# Altium PCB PCB1.PcbDoc
Units mm, origin at the board's own origin, x right, y up, seen from the top; angles counter-clockwise.
Board outline 151.89 x 130.3 mm, 2 copper layers (Top Layer, Bottom Layer); 18 components, 48 nets, 166 pads, 0 vias.
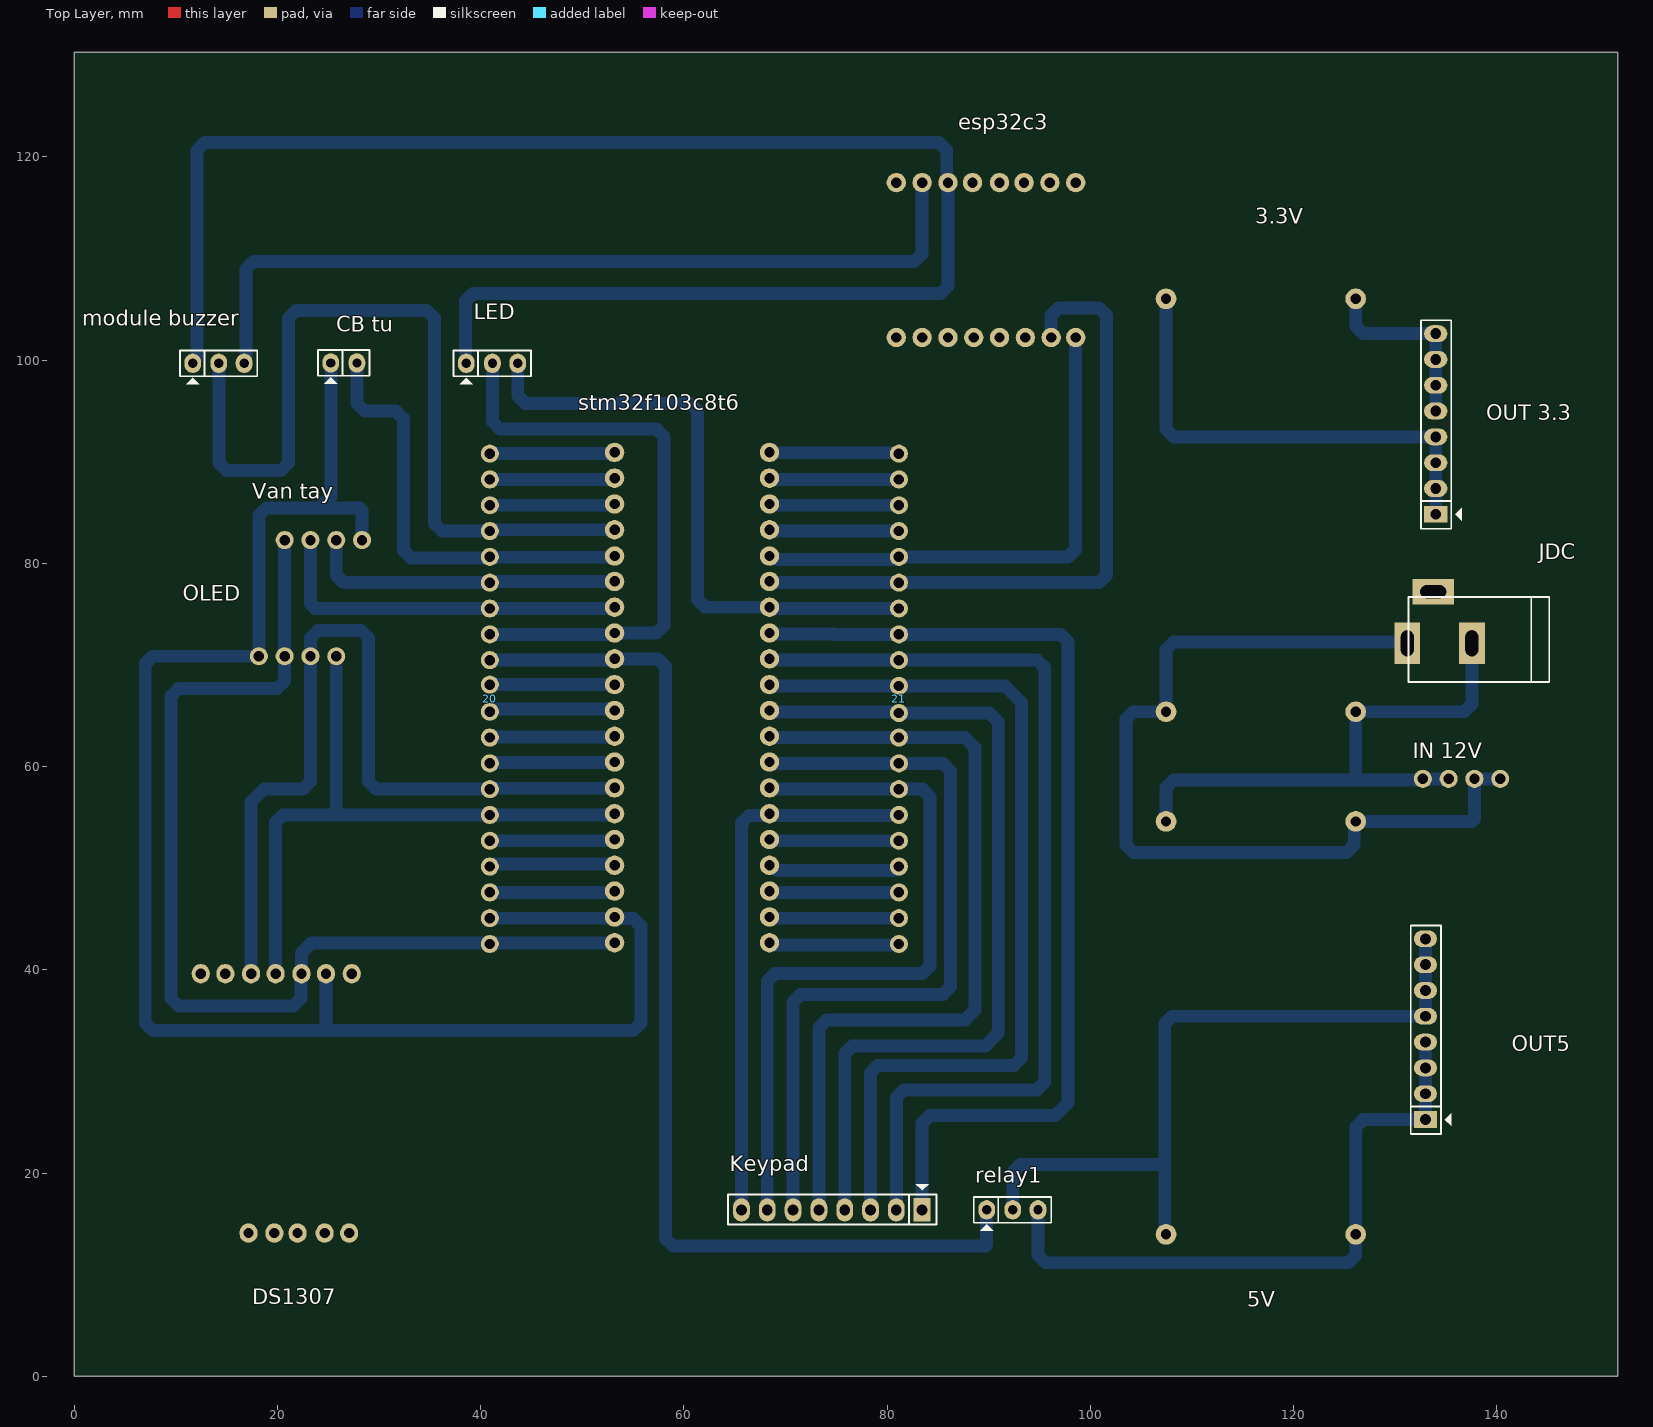
[diagram p0: Top Layer view]
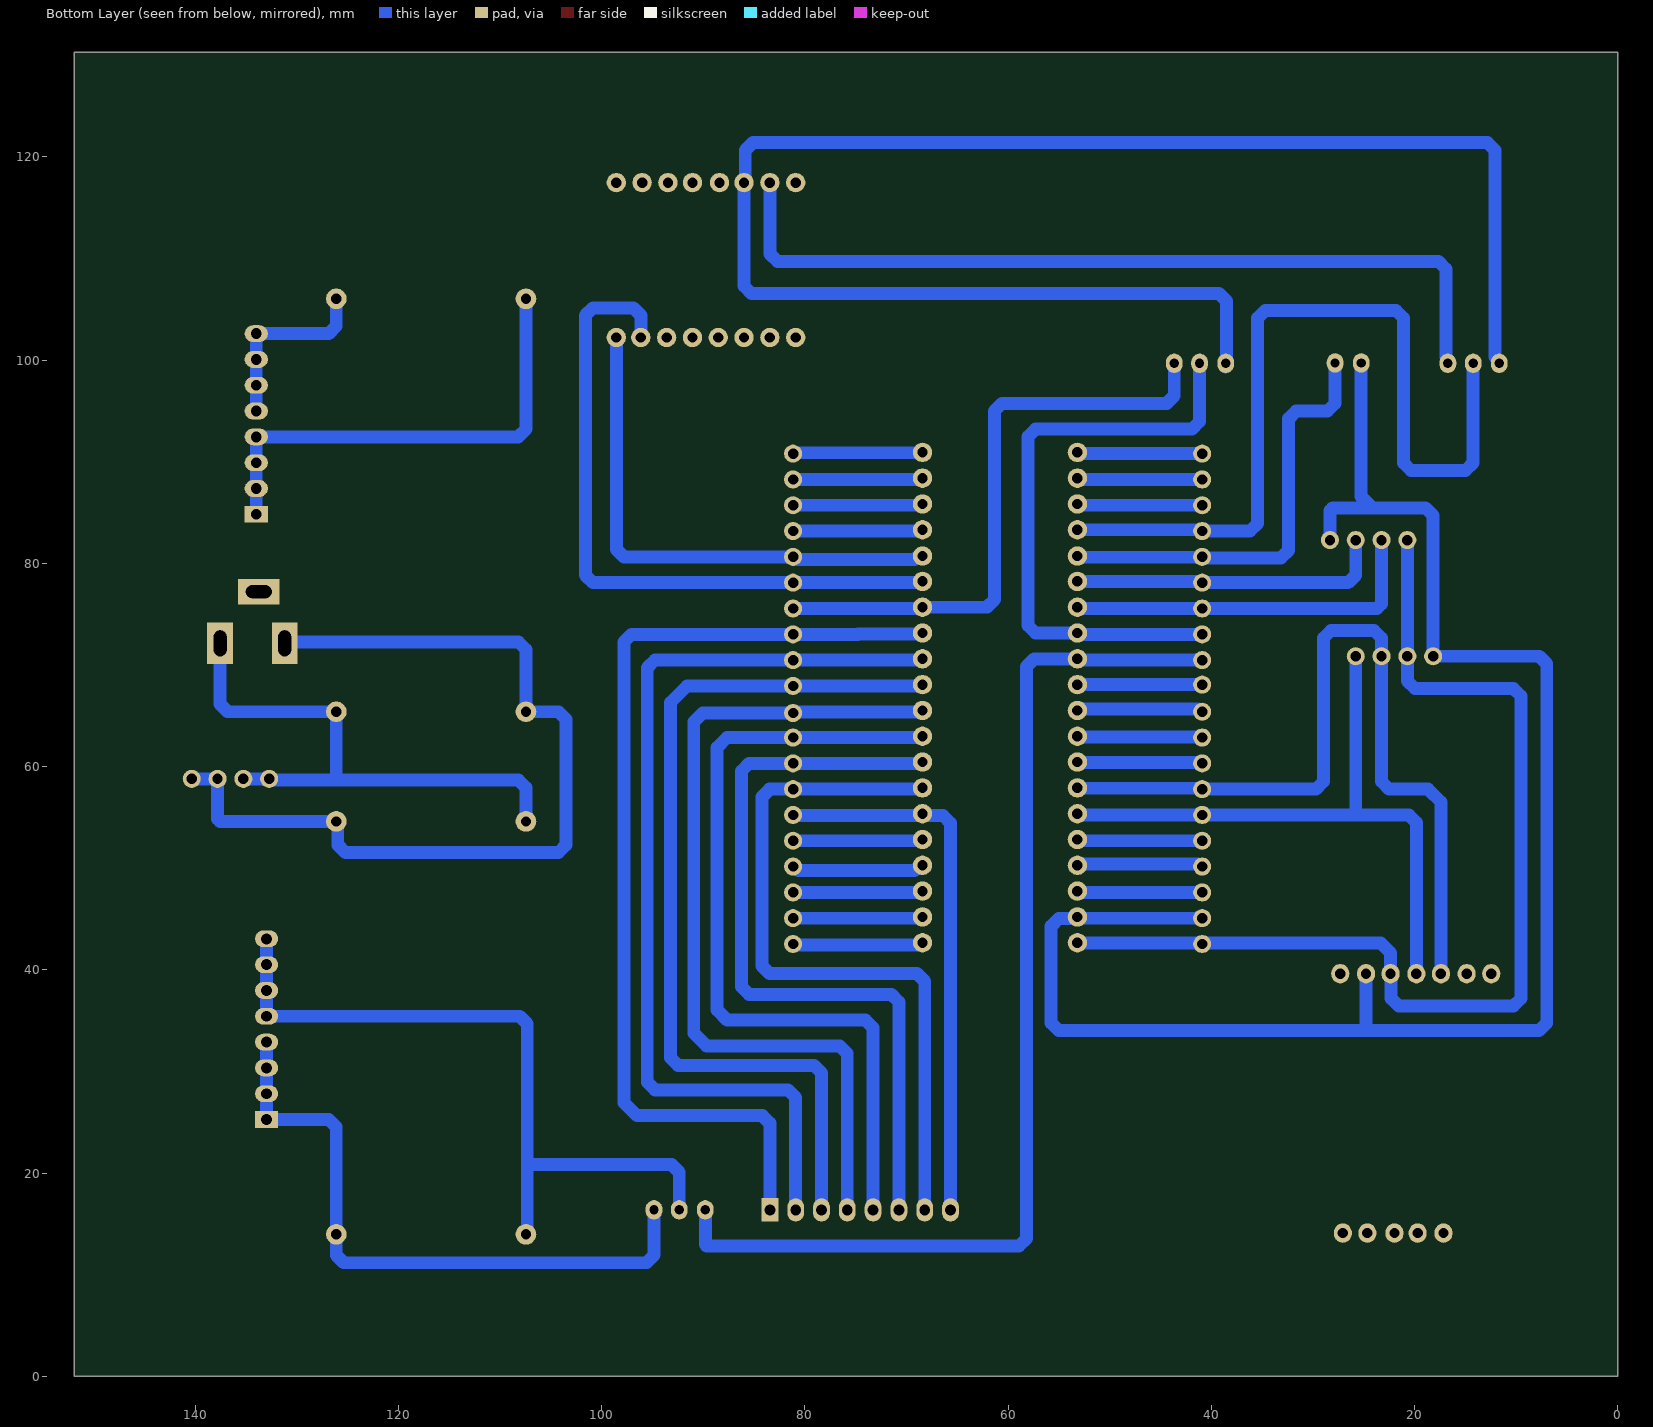
[diagram p1: Bottom Layer view, seen from below]

## Layer stack, top to bottom
Top Solder: solder mask 0.0102, Solder Resist, Dk 3.5
Top Layer: signal copper 0.0356
Dielectric 1: dielectric 0.32, FR-4, Dk 4.8
Bottom Layer: signal copper 0.0356
Bottom Solder: solder mask 0.0102, Solder Resist, Dk 3.5

## Board outline
0,0 151.892,0 151.892,130.302 0,130.302

## Design rules (kind name [scope] priority, off if disabled: settings)
Clearance [All] p1: gap=0.254 ignorepadtopadclearanceinfootprint=FALSE
PolygonConnect [All] p1: connectstyle=Relief reliefconductorwidth=0.254 reliefentries=4 polygonreliefangle="90 Angle" airgapwidth=0.254
RoutingLayers [All] p1: top layer_v5=FALSE bottom layer_v5=TRUE
RoutingVias [All] p1: holewidth=0.711 width=1.27 viastyle="Through Hole" minholewidth=0.711 minwidth=1.27 maxholewidth=0.711 maxwidth=1.27
SolderMaskExpansion [All] p1: expansion=0.102 istentingtop=FALSE
Width [All] p1: maxlimit=2.54 minlimit=0.762 preferedwidth=1.27
29 further rules are at their usual default settings.

## Components (designator, comment, footprint, x,y, rotation, side; value= is the part's Value field where it differs from the comment)
3.3V "lm2596" lm2596 107.696,54.102 r90 top
5V "lm2596" lm2596 125.857,65.913 r270 top
20 "jp20" jp20 67.056,45.466 r180 top
21 "jp20" jp20 54.991,87.884 r0 top
"CB tu" "Jumper 2" JP2 25.248,99.733 r0 top value="JP 2"
DS1307 "DS1307" DS1307 19.304,2.286 r90 top
esp32c3 "esp32c3" esp32c3 80.645,100.457 r90 top
"IN 12V" "jp4" jp4 142.113,73.406 r270 top
JDC "Jac DC" DC-IN 134.366,74.676 r180 top
Keypad "JP8 PIN" JP8 83.439,16.383 r180 top value=JP7
LED "Jumper 3" JP3 41.123,99.695 r0 top value=J3
"module buzzer" "Jumper 3" JP3 14.199,99.695 r0 top value=J3
OLED "oled 0.96" "oled 0.96" 2.54,70.866 r0 top
OUT5 "JP8 PIN" JP8 132.969,25.273 r90 top value=JP7
"OUT 3.3" "JP8 PIN" JP8 133.985,84.836 r90 top value=JP7
relay1 "Jumper 3" JP3 92.329,16.383 r0 top value=J3
stm32f103c8t6 "stm32f103c8t6" stm32f103c8t6 44.791,84.709 r0 top
"Van tay" "jp4" jp4 18.923,67.691 r90 top

## Footprints (in the part's own frame and the unit in brackets; to place one, negate y for a bottom-side part, rotate by r counter-clockwise, add the part's x,y. Pads: shape width x height; smd on the part's side, far side on the other; paste and mask are expansions set on the pad)
DC-IN [mil] "Jac DC input"
  rect 100x160 hole 50 slot 100 at 90 deg: 1(125,100) 2(-125,100)
  rect 160x100 hole 50 slot 100 at 0 deg: 3(25,-100)
  silkscreen extent -425,-80 120,250, body extent -410,-105 134,269, height 434
DS1307 [mil]
  oval 75x70 hole 40: 1(465,85) 2(465,-15) 3(465,-105) 4(465,-210) 5(465,-305) BAT(1470,-315) DS(1470,175) GND(1470,-215) SCL(1470,75) SDA(1470,-20) SQ(1470,270) VCC(1470,-120)
  body extent 415,-671 1520,451, height 374
esp32c3 [mil]
  round 75 hole 40: 1(70,-10) 2(70,-110) 3(70,-210) 4(70,-310) 5(70,-410) 6(70,-510) 7(70,-610) 8(70,-705) 9(670,-705) 10(670,-605) 11(670,-505) 12(670,-410) 13(670,-305) 14(670,-210) 15(670,-110) 16(670,-10)
  body extent 19,-834 720,114, height 374
JP2 [mil]
  oval 65x75 hole 36: 1(0,0) 2(101,0)
  silkscreen extent -50,-81 150,50, body extent -48,-50 148,48, height 323
JP3 [mil] "Jumper 3"
  oval 65x75 hole 36: 1(-100,0) 2(1,0) 3(99,0)
  silkscreen extent -150,-81 150,50, body extent -150,-60 150,55, height 355
jp4 [mil]
  round 70 hole 40: 1(575,-70) 2(575,-170) 3(575,-270) 4(575,-370)
  body extent 525,-420 625,-20, height 374
JP8 [mil] "JP8"
  rect 65x90 hole 42: 1(0,0)
  oval 65x90 hole 42: 2(100,0) 3(200,0) 4(300,0) 5(400,0) 6(500,0) 7(600,0) 8(700,0)
  silkscreen extent -56,-100 752,57, body extent -48,-50 748,48, height 323
jp20 [mil]
  round 70 hole 40: 1(1030,115) 2(1030,15) 3(1030,-85) 4(1030,-185) 5(1030,-285) 6(1030,-385) 7(1030,-485) 8(1030,-585) 9(1030,-685) 10(1030,-785) 11(1030,-890) 12(1030,-985) 13(1030,-1085) 14(1030,-1185) 15(1030,-1285) 16(1030,-1385) 17(1030,-1485) 18(1030,-1585) 19(1030,-1685) 20(1030,-1785)
  body extent 980,-1835 1080,165, height 350
lm2596 [mil]
  round 80 hole 40: IN+(445,10) IN-(445,-725) OUT+(2045,10) OUT-(2045,-725)
  body extent 395,-776 2093,56, height 716
"oled 0.96" [mil]
  round 70 hole 40: GND(615,0) SCL(815,0) SDA(915,0) VCC(715,0)
  body extent 224,-1025 1306,69, height 474
stm32f103c8t6 [mil]
  round 75 hole 40: 1(330,245) 2(330,145) 3(330,45) 4(330,-55) 5(330,-156.69) 6(330,-255) 7(330,-355) 8(330,-455) 9(330,-555) 10(330,-655) 11(330,-755) 12(330,-855) 13(330,-955) 14(330,-1055) 15(330,-1155) 16(330,-1255) 17(330,-1355) 18(330,-1455) 19(330,-1555) 20(330,-1655) 21(930,-1655) 22(930,-1555) 23(930,-1455) 24(930,-1355) 25(930,-1255) 26(930,-1155) 27(930,-1055) 28(930,-955) 29(930,-855) 30(930,-755) 31(930,-655) 32(930,-555) 33(930,-455) 34(930,-355) 35(930,-255) 36(930,-156.69) 37(930,-55) 38(930,45) 39(930,145) 40(930,245)
  body extent 180,-1888 1080,378, height 545

## Part data
"CB tu": library part "JP 2"
JDC: library part DCIN, "Jac DC input"
Keypad OUT5 "OUT 3.3": library part JP8
LED "module buzzer" relay1: library part JP3

## Nets (pads, with @x,y where several pads share a name; then routed paths per layer and width w, separated by ;. In a path a pad name is that pad's centre, name@x,y a point inside that pad or via, vN(x,y) a via of type N, cw(c..) or ccw(c..) an arc to the next point about the centre after c; other vN are vias at no path point)
Net3.3V_IN+: 3.3V.IN+ 5V.IN+ "IN 12V.1" "IN 12V.2" JDC.1 | length 90.5
  Bottom Layer w1.27: JDC.1 130.683,72.136 130.556,72.263 108.186,72.263 107.442,71.519 3.3V.IN+ 104.249,65.405 103.505,64.661 103.505,52.306 104.249,51.562 125.221,51.562 125.965,52.306 125.965,54.464 5V.IN+ 137.541,54.61 137.795,54.864 137.795,58.801 140.335,58.801
Net3.3V_IN-: 3.3V.IN- 5V.IN- "IN 12V.3" "IN 12V.4" JDC.2 | length 56
  Bottom Layer w1.27: 5V.IN- 107.442,57.93 108.186,58.674 125.984,58.674 ; 132.715,58.674 125.984,58.674 ; 132.715,58.801 135.255,58.801 ; JDC.2 137.541,66.149 136.797,65.405 3.3V.IN- 126.111,58.801 125.984,58.674
Net3.3V_OUT+: 3.3V.OUT+ "OUT 3.3.1" "OUT 3.3.2" "OUT 3.3.3" "OUT 3.3.4" | length 47.3
  Bottom Layer w1.27: 3.3V.OUT+ 107.442,93.218 108.204,92.456 133.985,92.456 133.985,89.916 133.985,87.376 133.985,84.836
Net3.3V_OUT-: 3.3V.OUT- "OUT 3.3.5" "OUT 3.3.6" "OUT 3.3.7" "OUT 3.3.8" | length 18.5
  Bottom Layer w1.27: 3.3V.OUT- 126.111,103.36 126.855,102.616 133.985,102.616 133.985,100.076 133.985,97.536 133.985,94.996
Net5V_OUT+: 5V.OUT+ OUT5.1 OUT5.2 OUT5.3 OUT5.4 relay1.3 | length 63.7
  Bottom Layer w1.27: relay1.3 94.844,11.92 95.588,11.176 125.367,11.176 126.111,11.92 126.111,24.529 126.855,25.273 OUT5.1 OUT5.2 OUT5.3 OUT5.4
Net5V_OUT-: 5V.OUT- OUT5.5 OUT5.6 OUT5.7 OUT5.8 relay1.2 | length 73.3
  Bottom Layer w1.27: relay1.2 92.354,20.084 93.098,20.828 107.315,20.828 ; 5V.OUT- 107.315,14.097 107.315,20.828 ; OUT5.8 OUT5.7 OUT5.6 OUT5.5 108.059,35.433 107.315,34.689 107.315,20.828
Net20_1: 20.1 "Van tay.1" DS1307.VCC OLED.VCC stm32f103c8t6.20 | length 104.6
  Bottom Layer w1.27: 20.701,82.296 OLED.VCC 20.701,68.435 19.957,67.691 10.269,67.691 9.525,66.947 9.525,37.193 10.269,36.449 21.548,36.449 22.292,37.193 DS1307.VCC@22.292,39.534 ; DS1307.VCC 22.352,41.674 23.32,42.642 20.1@41.129,42.642 ; 20.1@40.981,42.632 stm32f103c8t6.20@53.213,42.632
Net20_2: 20.2 "CB tu.1" "Van tay.4" DS1307.GND OLED.GND stm32f103c8t6.19 | length 168.5
  Bottom Layer w1.27: 24.765,34.163 DS1307.GND ; 25.248,99.733 25.248,86.589 24.13,85.471 ; 28.321,82.296 28.321,85.217 28.067,85.471 24.13,85.471 ; 20.2 52.874,45.085 53.001,45.212 stm32f103c8t6.19 ; stm32f103c8t6.19@53.213,45.045 55.009,45.045 55.753,44.301 55.753,34.78 55.009,34.036 7.729,34.036 6.985,34.78 6.985,70.122 7.729,70.866 OLED.GND 18.161,84.727 18.905,85.471 24.13,85.471
Net20_3: 20.3 stm32f103c8t6.18 | length 12.3
  Bottom Layer w1.27: 20.3 stm32f103c8t6.18@53.173,47.625
Net20_4: 20.4 stm32f103c8t6.17 | length 12.5
  Bottom Layer w1.27: 20.4 41.031,50.165 41.285,50.419 52.747,50.419 53.041,50.125 stm32f103c8t6.17@53.213,50.125
Net20_5: 20.5 stm32f103c8t6.16 | length 12.2
  Bottom Layer w1.27: 20.5 stm32f103c8t6.16@53.126,52.705
Net20_6: 20.6 DS1307.SDA OLED.SDA stm32f103c8t6.15 | length 64.2
  Bottom Layer w1.27: DS1307.SDA 19.812,54.501 20.556,55.245 25.781,55.245 ; OLED.SDA 25.781,55.245 ; stm32f103c8t6.15@53.173,55.245 20.6 25.781,55.245
Net20_7: 20.7 DS1307.SCL OLED.SCL stm32f103c8t6.14 | length 83
  Bottom Layer w1.27: DS1307.SCL 17.399,56.515 18.669,57.785 22.497,57.785 23.241,58.529 23.241,71.101 OLED.SCL@23.31,71.032 ; OLED.SCL 23.241,72.662 23.985,73.406 28.212,73.406 28.956,72.662 28.956,58.529 29.7,57.785 20.7 ; 20.7@40.981,57.872 stm32f103c8t6.14@53.213,57.872
Net20_8: 20.8 stm32f103c8t6.13 | length 12.2
  Bottom Layer w1.27: 20.8@40.981,60.412 stm32f103c8t6.13@53.213,60.412
Net20_9: 20.9 stm32f103c8t6.12 | length 12.5
  Bottom Layer w1.27: 20.9 40.957,62.928 53.109,62.928 stm32f103c8t6.12 ; stm32f103c8t6.12@53.091,62.819 stm32f103c8t6.12@53.213,62.698
Net20_10: 20.10 stm32f103c8t6.11 | length 12.5
  Bottom Layer w1.27: 20.10 41.031,65.405 41.285,65.659 52.747,65.659 53.041,65.365 stm32f103c8t6.11@53.213,65.365
Net20_11: 20.11 stm32f103c8t6.10 | length 12.3
  Bottom Layer w1.27: 20.11 stm32f103c8t6.10
Net20_12: 20.12 relay1.1 stm32f103c8t6.9 | length 109.3
  Bottom Layer w1.27: 20.12 stm32f103c8t6.9@53.173,70.485 ; stm32f103c8t6.9 57.422,70.612 58.166,69.868 58.166,13.571 58.91,12.827 89.662,12.827 89.789,12.954 relay1.1
Net20_13: 20.13 LED.2 stm32f103c8t6.8 | length 58.8
  Bottom Layer w1.27: 20.13 stm32f103c8t6.8@53.126,73.025 ; LED.2@41.148,99.314 41.148,93.962 41.892,93.218 57.295,93.218 58.039,92.474 58.039,73.896 57.295,73.152 stm32f103c8t6.8
Net20_14: 20.14 "Van tay.2" stm32f103c8t6.7 | length 36.4
  Bottom Layer w1.27: 23.241,82.296 23.241,76.026 23.702,75.565 20.14 stm32f103c8t6.7@53.173,75.565
Net20_15: 20.15 "Van tay.3" stm32f103c8t6.6 | length 31.2
  Bottom Layer w1.27: 25.781,82.296 25.781,78.849 26.525,78.105 20.15 40.991,78.202 41.35,78.202 41.38,78.232 stm32f103c8t6.6
Net20_16: 20.16 "CB tu.2" stm32f103c8t6.5 | length 43.3
  Bottom Layer w1.27: 27.813,99.733 27.813,95.74 28.557,94.996 31.641,94.996 32.385,94.252 32.385,81.292 33.129,80.548 40.797,80.548 20.16 ; 20.16@40.934,80.605 stm32f103c8t6.5@53.213,80.605
Net20_17: 20.17 "module buzzer.2" stm32f103c8t6.4 | length 84.8
  Bottom Layer w1.27: 14.224,99.695 14.224,89.898 14.968,89.154 20.338,89.154 21.082,89.898 21.082,104.158 21.826,104.902 34.689,104.902 35.433,104.158 35.433,83.929 36.177,83.185 20.17 40.991,83.282 41.35,83.282 41.38,83.312 stm32f103c8t6.4
Net20_18: 20.18 stm32f103c8t6.3 | length 12.2
  Bottom Layer w1.27: 20.18 stm32f103c8t6.3@53.126,85.725
Net20_19: 20.19 stm32f103c8t6.2 | length 12.3
  Bottom Layer w1.27: 20.19 40.914,88.245 53.193,88.245 stm32f103c8t6.2@53.213,88.225
Net20_20: 20.20 stm32f103c8t6.1 | length 12.4
  Bottom Layer w1.27: 20.20 52.874,90.805 53.041,90.638 stm32f103c8t6.1@53.213,90.638
Net21_1: 21.1 stm32f103c8t6.40 | length 12.6
  Bottom Layer w1.27: stm32f103c8t6.40@68.453,90.892 21.1@81.066,90.892
Net21_2: 21.2 stm32f103c8t6.39 | length 12.6
  Bottom Layer w1.27: stm32f103c8t6.39@68.529,88.265 21.2
Net21_3: 21.3 stm32f103c8t6.38 | length 12.6
  Bottom Layer w1.27: stm32f103c8t6.38@68.518,85.725 21.3
Net21_4: 21.4 stm32f103c8t6.37 | length 12.6
  Bottom Layer w1.27: stm32f103c8t6.37@68.508,83.185 21.4
Net21_5: 21.5 esp32c3.8 stm32f103c8t6.36 | length 51.5
  Bottom Layer w1.27: stm32f103c8t6.36@68.453,80.689 68.575,80.568 69.024,80.568 69.2,80.391 80.762,80.391 81.016,80.645 21.5 97.808,80.645 98.552,81.389 esp32c3.8
Net21_6: 21.6 esp32c3.7 stm32f103c8t6.35 | length 67.2
  Bottom Layer w1.27: stm32f103c8t6.35@68.486,78.105 21.6 100.856,78.105 101.6,78.849 101.6,104.412 100.856,105.156 96.883,105.156 96.139,104.412 esp32c3.7
Net21_7: 21.7 LED.3 stm32f103c8t6.34 | length 59.8
  Bottom Layer w1.27: LED.3@43.637,99.314 43.637,96.502 44.381,95.758 60.597,95.758 61.341,95.014 61.341,76.436 62.085,75.692 stm32f103c8t6.34 ; stm32f103c8t6.34@68.476,75.565 21.7
Net21_8: 21.8 Keypad.1 stm32f103c8t6.33 | length 99
  Bottom Layer w1.27: stm32f103c8t6.33@68.453,73.037 74.778,73.037 74.79,73.025 21.8 97.046,73.025 97.79,72.281 97.79,26.924 96.52,25.654 84.183,25.654 83.439,24.91 Keypad.1@83.439,16.105
Net21_9: 21.9 Keypad.2 stm32f103c8t6.32 | length 94.2
  Bottom Layer w1.27: stm32f103c8t6.32@68.453,70.486 74.778,70.486 74.779,70.485 21.9 94.742,70.485 95.504,69.723 95.504,28.956 94.742,28.194 81.643,28.194 80.899,27.45 Keypad.2@80.899,16.637
Net21_10: 21.10 Keypad.3 stm32f103c8t6.31 | length 89.4
  Bottom Layer w1.27: stm32f103c8t6.31@68.453,67.936 74.778,67.936 74.787,67.945 21.10 91.585,67.945 93.218,66.312 93.218,31.351 92.474,30.607 79.103,30.607 78.359,29.863 Keypad.3
Net21_11: 21.11 Keypad.4 stm32f103c8t6.30 | length 84.8
  Bottom Layer w1.27: stm32f103c8t6.30@68.453,65.385 80.909,65.385 81.016,65.278 21.11 90.043,65.278 90.932,64.389 90.932,33.782 89.662,32.512 76.563,32.512 75.819,31.768 Keypad.4
Net21_12: 21.12 Keypad.5 stm32f103c8t6.29 | length 80.4
  Bottom Layer w1.27: stm32f103c8t6.29@68.484,62.865 21.12 87.648,62.865 88.646,61.867 88.646,36.068 87.63,35.052 74.023,35.052 73.279,34.308 Keypad.5
Net21_13: 21.13 Keypad.6 stm32f103c8t6.28 | length 75.9
  Bottom Layer w1.27: stm32f103c8t6.28@68.495,60.325 21.13 85.489,60.325 86.233,59.581 86.233,38.336 85.489,37.592 71.483,37.592 70.739,36.848 Keypad.6
Net21_14: 21.14 Keypad.7 stm32f103c8t6.27 | length 71.8
  Bottom Layer w1.27: Keypad.7 68.199,38.88 68.943,39.624 83.457,39.624 84.201,40.368 84.201,57.041 83.457,57.785 21.14 stm32f103c8t6.27@68.505,57.785
Net21_15: 21.15 Keypad.8 stm32f103c8t6.26 | length 53.9
  Bottom Layer w1.27: Keypad.8 65.659,54.438 66.403,55.182 68.051,55.182 68.12,55.25 68.344,55.25 68.413,55.182 21.15@81.09,55.182
Net21_16: 21.16 stm32f103c8t6.25 | length 12.6
  Bottom Layer w1.27: stm32f103c8t6.25@68.527,52.705 21.16
Net21_17: 21.17 stm32f103c8t6.24 | length 13
  Bottom Layer w1.27: stm32f103c8t6.24@68.453,50.081 68.575,49.959 69.024,49.959 69.199,49.784 80.635,49.784 81.016,50.165 21.17
Net21_18: 21.18 stm32f103c8t6.23 | length 12.7
  Bottom Layer w1.27: stm32f103c8t6.23@68.453,47.53 68.548,47.625 21.18
Net21_19: 21.19 stm32f103c8t6.22 | length 12.7
  Bottom Layer w1.27: stm32f103c8t6.22@68.453,44.979 68.559,45.085 21.19
Net21_20: 21.20 stm32f103c8t6.21 | length 12.7
  Bottom Layer w1.27: stm32f103c8t6.21@68.453,42.429 80.899,42.429 81.016,42.545 21.20
Netesp32c3_14: "module buzzer.1" esp32c3.14 LED.1 | length 163.6
  Bottom Layer w1.27: 11.659,99.695 11.659,99.925 12.065,100.331 12.065,120.668 12.809,121.412 85.114,121.412 85.857,120.668 85.857,117.597 esp32c3.14 85.979,107.297 85.235,106.553 39.225,106.553 38.481,105.809 38.481,99.812 38.51,99.783 38.51,99.387 LED.1@38.583,99.314
Netesp32c3_15: "module buzzer.3" esp32c3.15 | length 83.5
  Bottom Layer w1.27: 16.713,99.695 16.786,99.768 16.786,100.164 16.891,100.269 16.891,108.984 17.635,109.728 82.695,109.728 83.439,110.472 esp32c3.15
pads on no net: DS1307.1 DS1307.2 DS1307.3 DS1307.4 DS1307.5 DS1307.BAT DS1307.DS DS1307.SQ esp32c3.1 esp32c3.2 esp32c3.3 esp32c3.4 esp32c3.5 esp32c3.6 esp32c3.9 esp32c3.10 esp32c3.11 esp32c3.12 esp32c3.13 esp32c3.16 JDC.3